# Altium PCB CSI2-KRIA-KV260_Rev01.PcbDoc (part 2 of 3)
Units mm, origin at the board's own origin, x right, y up, seen from the top; angles counter-clockwise.
Board outline 119 x 44.5 mm, 4 copper layers (Layer1 Top, Layer2, Layer3, Layer4 Bottom), stack 1.59 mm thick; 145 components, 82 nets, 488 pads, 229 vias.
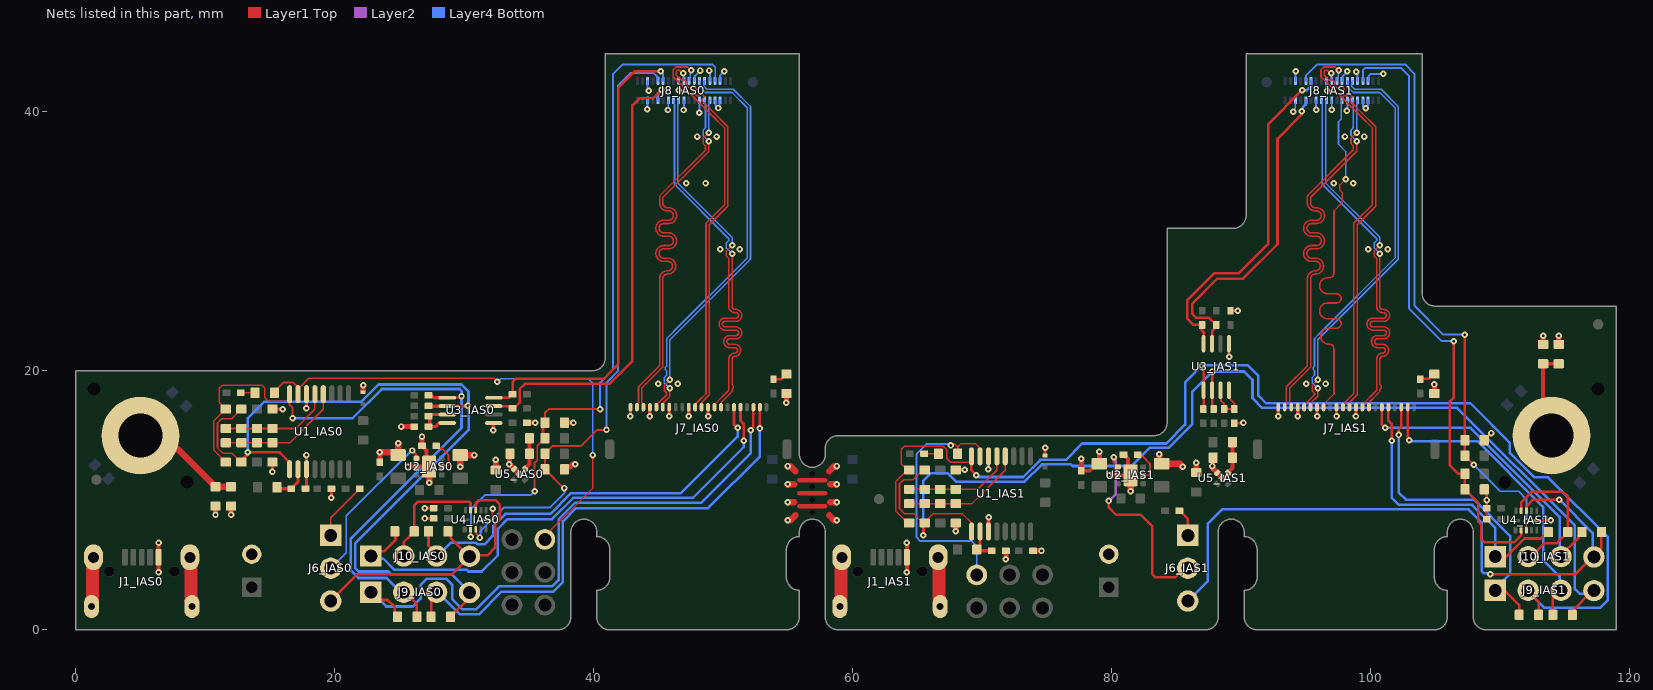
[diagram p4: the nets of this part, all layers, seen from the top]

## Via types
v1: diameter 0.5, hole 0.2, Layer1 Top to Layer4 Bottom, 229 vias

## Nets (pads, with @x,y where several pads share a name; then routed paths per layer and width w, separated by ;. In a path a pad name is that pad's centre, name@x,y a point inside that pad or via, vN(x,y) a via of type N, cw(c..) or ccw(c..) an arc to the next point about the centre after c; other vN are vias at no path point) (continued)
B7-CSI2-TXC_IAS1_P: J7_IAS1.15 J8_IAS1.7 | length 31.1
  Layer1 Top w0.125: J7_IAS1.15@96.39,17.2 96.39,17.411 97.19,18.211 97.19,20.825 97.19,21.706 ccw(c96.827,21.706) 96.827,22.069 96.782,22.069 cw(c96.782,22.681) 96.782,23.294 97.383,23.294 ccw(c97.383,23.656) 97.383,24.019 96.692,24.019 cw(c96.692,24.631) 96.692,25.244 97.383,25.244 ccw(c97.383,25.606) 97.383,25.969 96.692,25.969 cw(c96.692,26.581) 96.692,27.194 96.827,27.194 ccw(c96.827,27.556) 97.19,27.556 97.19,30.669 97.19,32.35 97.84,33 97.84,33.775 97.652,33.963 97.652,34.362 v1(98.09,34.8)
  Layer4 Bottom w0.125: J8_IAS1.7@97.82,40.9 97.767,40.847 97.767,40.612 97.745,40.589 97.745,39.455 97.54,39.25 97.54,37.5 98.09,36.95 v1(98.09,34.8)
B7-CSI2-TXD0_IAS0_N: J7_IAS0.20 J8_IAS0.5 | length 31.1
  Layer1 Top w0.125: J7_IAS0.20@43.85,17.15 J7_IAS0.20@43.85,17.2 43.85,17.411 43.725,17.536 43.725,18.671 45.35,20.296 45.35,26.389 45.35,27.118 cw(c45.712,27.118) 45.712,27.481 45.736,27.481 ccw(c45.736,28.093) 45.736,28.706 45.425,28.706 cw(c45.425,29.068) 45.425,29.431 45.808,29.431 ccw(c45.808,30.043) 45.808,30.656 45.425,30.656 cw(c45.425,31.018) 45.425,31.381 45.808,31.381 ccw(c45.808,31.993) 45.808,32.606 45.712,32.606 cw(c45.712,32.968) 45.35,32.968 45.35,33.156 45.35,33.396 48.9,36.946 v1(48.9,37.75)
  Layer4 Bottom w0.125: J8_IAS0.5@48.58,40.9 48.632,40.848 48.632,40.607 48.65,40.589 48.65,38.775 48.462,38.587 48.462,38.188 v1(48.9,37.75)
B7-CSI2-TXD0_IAS0_P: J7_IAS0.21 J8_IAS0.4 | length 31.1
  Layer1 Top w0.125: J7_IAS0.21@43.35,17.2 43.35,17.411 43.475,17.536 43.475,18.775 45.1,20.4 45.1,26.389 45.1,27.118 cw(c45.712,27.118) 45.712,27.731 45.736,27.731 ccw(c45.736,28.093) 45.736,28.456 45.425,28.456 cw(c45.425,29.068) 45.425,29.681 45.808,29.681 ccw(c45.808,30.043) 45.808,30.406 45.425,30.406 cw(c45.425,31.018) 45.425,31.631 45.808,31.631 ccw(c45.808,31.993) 45.808,32.356 45.712,32.356 cw(c45.712,32.968) 45.1,32.968 45.1,33.156 45.1,33.5 48.65,37.05 48.65,37.375 48.462,37.563 48.462,37.962 v1(48.9,38.4)
  Layer4 Bottom w0.125: v1(48.9,38.4) 48.9,40.589 48.927,40.617 48.927,40.848 J8_IAS0.4@48.98,40.9
B7-CSI2-TXD0_IAS1_N: J7_IAS1.20 J8_IAS1.5 | length 31.1
  Layer1 Top w0.125: J7_IAS1.20@93.89,17.15 J7_IAS1.20@93.89,17.2 93.89,17.411 93.765,17.536 93.765,18.671 95.39,20.296 95.39,26.389 95.39,27.118 cw(c95.753,27.118) 95.753,27.481 95.776,27.481 ccw(c95.776,28.093) 95.776,28.706 95.465,28.706 cw(c95.465,29.068) 95.465,29.431 95.848,29.431 ccw(c95.848,30.043) 95.848,30.656 95.465,30.656 cw(c95.465,31.018) 95.465,31.381 95.848,31.381 ccw(c95.848,31.993) 95.848,32.606 95.753,32.606 cw(c95.753,32.968) 95.39,32.968 95.39,33.156 95.39,33.416 98.94,36.966 v1(98.94,37.75)
  Layer4 Bottom w0.125: J8_IAS1.5@98.62,40.9 98.672,40.847 98.672,40.607 98.69,40.589 98.69,38.775 98.502,38.587 98.502,38.188 v1(98.94,37.75)
B7-CSI2-TXD0_IAS1_P: J7_IAS1.21 J8_IAS1.4 | length 31.1
  Layer1 Top w0.125: J7_IAS1.21@93.39,17.2 93.39,17.411 93.515,17.536 93.515,18.775 95.14,20.4 95.14,26.389 95.14,27.118 cw(c95.753,27.118) 95.753,27.731 95.776,27.731 ccw(c95.776,28.093) 95.776,28.456 95.465,28.456 cw(c95.465,29.068) 95.465,29.681 95.848,29.681 ccw(c95.848,30.043) 95.848,30.406 95.465,30.406 cw(c95.465,31.018) 95.465,31.631 95.848,31.631 ccw(c95.848,31.993) 95.848,32.356 95.753,32.356 cw(c95.753,32.968) 95.14,32.968 95.14,33.156 95.14,33.52 98.69,37.07 98.69,37.375 98.502,37.563 98.502,37.962 v1(98.94,38.4)
  Layer4 Bottom w0.125: v1(98.94,38.4) 98.94,40.589 98.967,40.617 98.967,40.847 J8_IAS1.4@99.02,40.9
B7-CSI2-TXD1_IAS0_N: J7_IAS0.17 J8_IAS0.29 | length 31.1
  Layer1 Top w0.125: J7_IAS0.17@45.35,17.2 45.383,17.233 45.383,17.53 45.9,18.046 v1(45.9,18.65)
  Layer4 Bottom w0.125: v1(45.9,18.65) 45.462,19.088 45.462,19.487 45.65,19.675 45.65,19.805 45.65,19.811 45.65,19.995 45.541,20.105 45.541,20.255 45.65,20.364 45.65,20.464 45.65,22.5 46.176,23.026 ; 46.2,23.05 51.873,28.723 51.873,40.323 50.696,41.5 48.646,41.5 48.573,41.573 48.255,41.891 48.255,42.089 48.232,42.112 48.232,42.348 J8_IAS0.29@48.18,42.4
B7-CSI2-TXD1_IAS0_P: J7_IAS0.18 J8_IAS0.30 | length 31.1
  Layer1 Top w0.125: J7_IAS0.18@44.85,17.2 44.85,17.358 45.65,18.158 45.65,18.275 45.462,18.463 45.462,18.862 v1(45.9,19.3)
  Layer4 Bottom w0.125: v1(45.9,19.3) 45.9,22.396 52.123,28.62 52.123,40.427 50.8,41.75 48.75,41.75 48.505,41.995 48.505,42.089 48.527,42.112 48.527,42.348 J8_IAS0.30@48.58,42.4
B7-CSI2-TXD1_IAS1_N: J7_IAS1.17 J8_IAS1.29 | length 31.1
  Layer1 Top w0.125: J7_IAS1.17@95.39,17.2 95.423,17.233 95.423,17.53 95.94,18.046 v1(95.94,18.65)
  Layer4 Bottom w0.125: v1(95.94,18.65) 95.502,19.088 95.502,19.487 95.69,19.675 95.69,19.805 95.69,19.811 95.69,19.995 95.581,20.105 95.581,20.255 95.69,20.364 95.69,20.464 95.69,22.5 96.216,23.026 ; 96.24,23.05 101.913,28.723 101.913,40.323 100.736,41.5 98.686,41.5 98.613,41.573 98.295,41.891 98.295,42.089 98.272,42.112 98.272,42.347 J8_IAS1.29@98.22,42.4
B7-CSI2-TXD1_IAS1_P: J7_IAS1.18 J8_IAS1.30 | length 31.1
  Layer1 Top w0.125: J7_IAS1.18@94.89,17.2 94.89,17.358 95.69,18.158 95.69,18.275 95.502,18.462 95.502,18.862 v1(95.94,19.3)
  Layer4 Bottom w0.125: v1(95.94,19.3) 95.94,22.396 102.163,28.62 102.163,40.427 100.84,41.75 98.79,41.75 98.545,41.995 98.545,42.089 98.567,42.112 98.567,42.347 J8_IAS1.30@98.62,42.4
B7-CSI2-TXD2_IAS0_N: J7_IAS0.11 J8_IAS0.26 | length 31
  Layer1 Top w0.125: v1(46.942,43) 46.841,43 46.621,43.22 46.473,43.22 46.4,43.147 46.4,42.831 46.546,42.685 46.764,42.468 46.867,42.468 46.907,42.508 46.997,42.508 47.208,42.297 47.208,42.207 47.161,42.16 47.161,42.07 47.371,41.86 47.462,41.86 47.624,42.023 47.714,42.023 47.925,41.812 47.925,41.722 47.762,41.559 47.762,41.469 47.972,41.259 48.063,41.259 48.225,41.422 48.316,41.422 48.526,41.211 48.526,41.121 48.37,40.965 48.37,40.861 49.316,39.916 50.37,38.861 50.37,32.72 48.94,31.29 48.94,18.147 48.373,17.58 48.373,17.223 J7_IAS0.11@48.35,17.2
  Layer4 Bottom w0.125: v1(46.942,43) 46.961,42.981 J8_IAS0.26@46.961,42.419
B7-CSI2-TXD2_IAS0_P: J7_IAS0.12 J8_IAS0.27 | length 31.1
  Layer1 Top w0.125: v1(47.535,43.221) 47.503,43.221 47.254,43.47 46.37,43.47 46.15,43.25 46.15,42.728 49.139,39.739 50.12,38.758 50.12,32.824 48.69,31.394 48.69,18.251 48.123,17.683 48.048,17.609 47.85,17.411 J7_IAS0.12@47.85,17.2
  Layer4 Bottom w0.125: J8_IAS0.27@47.38,42.4 47.38,42.585 47.477,42.682 47.477,43.164 v1(47.535,43.221)
B7-CSI2-TXD2_IAS1_N: J7_IAS1.11 J8_IAS1.26 | length 31
  Layer1 Top w0.125: v1(96.982,43) 96.881,43 96.661,43.22 96.513,43.22 96.44,43.147 96.44,42.831 96.586,42.685 96.804,42.468 96.907,42.468 96.947,42.508 97.037,42.508 97.248,42.297 97.248,42.207 97.201,42.16 97.201,42.07 97.411,41.86 97.502,41.86 97.664,42.023 97.754,42.023 97.965,41.812 97.965,41.722 97.802,41.559 97.802,41.469 98.012,41.259 98.103,41.259 98.265,41.421 98.356,41.421 98.566,41.211 98.566,41.121 98.41,40.965 98.41,40.861 99.356,39.916 100.41,38.861 100.41,32.72 98.98,31.29 98.98,18.147 98.413,17.58 98.413,17.223 J7_IAS1.11@98.39,17.2
  Layer4 Bottom w0.125: v1(96.982,43) 97.001,42.981 J8_IAS1.26@97.001,42.419
B7-CSI2-TXD2_IAS1_P: J7_IAS1.12 J8_IAS1.27 | length 31.1
  Layer1 Top w0.125: v1(97.575,43.221) 97.543,43.221 97.294,43.47 96.41,43.47 96.19,43.25 96.19,42.728 99.179,39.739 100.16,38.758 100.16,32.824 98.73,31.394 98.73,18.251 98.163,17.683 98.088,17.609 97.89,17.411 J7_IAS1.12@97.89,17.2
  Layer4 Bottom w0.125: J8_IAS1.27@97.42,42.4 97.42,42.585 97.517,42.682 97.517,43.164 v1(97.575,43.221)
B7-CSI2-TXD3_IAS0_N: J7_IAS0.8 J8_IAS0.11 | length 31
  Layer1 Top w0.125: J7_IAS0.8@49.876,17.226 49.876,17.576 50.475,18.175 50.7,18.4 50.7,18.59 50.805,18.695 50.805,18.845 50.7,18.95 50.7,19.05 50.7,20 50.7,20.052 50.7,20.912 cw(c50.913,20.912) 50.913,21.125 ccw(c50.913,21.587) 50.913,22.05 50.511,22.05 cw(c50.511,22.262) 50.511,22.475 50.988,22.475 ccw(c50.988,22.937) 50.988,23.4 50.163,23.4 cw(c50.163,23.612) 50.163,23.825 50.988,23.825 ccw(c50.988,24.287) 50.988,24.75 50.913,24.75 cw(c50.913,24.962) 50.7,24.962 50.7,25.15 v1(50.7,29.05)
  Layer4 Bottom w0.125: J8_IAS0.11@46.18,40.9 46.232,40.848 46.232,40.612 46.255,40.589 46.255,34.406 50.45,30.211 50.45,30.075 50.262,29.887 50.262,29.488 v1(50.7,29.05)
B7-CSI2-TXD3_IAS0_P: J7_IAS0.9 J8_IAS0.10 | length 31.1
  Layer1 Top w0.125: J7_IAS0.9@49.35,17.2 49.35,17.404 50.45,18.504 50.45,20.052 50.45,20.912 cw(c50.913,20.912) 50.913,21.375 ccw(c50.913,21.587) 50.913,21.8 50.511,21.8 cw(c50.511,22.262) 50.511,22.725 50.988,22.725 ccw(c50.988,22.937) 50.988,23.15 50.163,23.15 cw(c50.163,23.612) 50.163,24.075 50.988,24.075 ccw(c50.988,24.287) 50.988,24.5 50.913,24.5 cw(c50.913,24.962) 50.45,24.962 50.45,25.15 50.45,28.675 50.262,28.863 50.262,29.262 v1(50.7,29.7)
  Layer4 Bottom w0.125: J8_IAS0.10@46.58,40.9 46.527,40.848 46.527,40.612 46.505,40.589 46.505,34.509 50.7,30.314 v1(50.7,29.7)
B7-CSI2-TXD3_IAS1_N: J7_IAS1.8 J8_IAS1.11 | length 31
  Layer1 Top w0.125: J7_IAS1.8@99.916,17.226 99.916,17.576 100.515,18.175 100.74,18.4 100.74,18.59 100.845,18.695 100.845,18.845 100.74,18.95 100.74,19.05 100.74,20 100.74,20.052 100.74,20.912 cw(c100.952,20.912) 100.952,21.125 ccw(c100.952,21.587) 100.952,22.05 100.551,22.05 cw(c100.551,22.262) 100.551,22.475 101.027,22.475 ccw(c101.027,22.937) 101.027,23.4 100.202,23.4 cw(c100.202,23.612) 100.202,23.825 101.027,23.825 ccw(c101.027,24.287) 101.027,24.75 100.952,24.75 cw(c100.952,24.962) 100.74,24.962 100.74,25.15 v1(100.74,29.05)
  Layer4 Bottom w0.125: J8_IAS1.11@96.22,40.9 96.272,40.847 96.272,40.612 96.295,40.589 96.295,34.406 100.49,30.211 100.49,30.075 100.302,29.887 100.302,29.488 v1(100.74,29.05)
B7-CSI2-TXD3_IAS1_P: J7_IAS1.9 J8_IAS1.10 | length 31.1
  Layer1 Top w0.125: J7_IAS1.9@99.39,17.2 99.39,17.404 100.49,18.504 100.49,20.052 100.49,20.912 cw(c100.952,20.912) 100.952,21.375 ccw(c100.952,21.587) 100.952,21.8 100.551,21.8 cw(c100.551,22.262) 100.551,22.725 101.027,22.725 ccw(c101.027,22.937) 101.027,23.15 100.202,23.15 cw(c100.202,23.612) 100.202,24.075 101.027,24.075 ccw(c101.027,24.287) 101.027,24.5 100.952,24.5 cw(c100.952,24.962) 100.49,24.962 100.49,25.15 100.49,28.675 100.302,28.863 100.302,29.262 v1(100.74,29.7)
  Layer4 Bottom w0.125: J8_IAS1.10@96.62,40.9 96.567,40.847 96.567,40.612 96.545,40.589 96.545,34.509 100.74,30.314 v1(100.74,29.7)
C-GND_IAS0: C10_IAS0.2 J1_IAS0.6 J1_IAS0.7 J1_IAS0.8 J1_IAS0.9 R24_IAS0.1 X1_IAS0.1 | length 16.4
  Layer1 Top w0.5: X1_IAS0.1@5,15 6.052,13.948 7.902,13.948 10.65,11.2 10.65,11.15 10.75,11.05 R24_IAS0.1@12,11.05
  Layer1 Top w1: J1_IAS0.6@1.225,1.8 1.225,2.166 1.3,2.241 1.3,5.525 J1_IAS0.7@1.375,5.6 ; J1_IAS0.8@8.825,5.6 8.9,5.525 8.9,2.241 8.975,2.166 J1_IAS0.9@8.975,1.8
C-GND_IAS1: C10_IAS1.2 J1_IAS1.6 J1_IAS1.7 J1_IAS1.8 J1_IAS1.9 R24_IAS1.1 X1_IAS1.1 | length 13.6
  Layer1 Top w0.3: X1_IAS1.1@114,15 113.35,15.65 C10_IAS1.2@113.35,20.55 R24_IAS1.1@114.55,20.55
  Layer1 Top w1: J1_IAS1.6@59.1,2.241 J1_IAS1.7@59.1,5.525 ; J1_IAS1.9@66.7,2.241 J1_IAS1.8@66.7,5.525
EXT-GPIO0-I2C-SCL_IAS0: J7_IAS0.2 J9_IAS0.3 R15_IAS0.1 | length 39.5
  Layer1 Top w0.2: R15_IAS0.1@27.45,1 27.45,2.164 27.88,2.594 J9_IAS0.3@27.88,2.9 J9_IAS0.3@27.88,3 ; v1(52.85,15.55) J7_IAS0.2@52.85,17.2
  Layer4 Bottom w0.2: J9_IAS0.3@27.88,3 29.68,1.2 31.15,1.2 32.9,2.95 36.9,2.95 37.625,3.675 37.625,8.375 38.65,9.4 48.85,9.4 52.85,13.4 v1(52.85,15.55)
EXT-GPIO0-I2C-SCL_IAS1: J7_IAS1.2 J9_IAS1.3 R15_IAS1.1 | length 24.2
  Layer1 Top w0.2: J7_IAS1.2@102.89,17.2 102.89,14.76 v1(103,14.65) ; R15_IAS1.1@114.1,1.15 114.1,2.52 J9_IAS1.3@114.63,3.05
  Layer4 Bottom w0.2: v1(103,14.65) 103.1,14.55 108.3,14.55 113.35,9.5 113.35,5.4 114.63,4.12 J9_IAS1.3@114.63,3.05
EXT-GPIO1-I2C-SDA_IAS0: J7_IAS0.3 J9_IAS0.1 R16_IAS0.1 | length 47.5
  Layer1 Top w0.2: J9_IAS0.1@22.8,3 23.5,2.3 24.1,2.3 24.648,1.752 24.648,1.202 R16_IAS0.1@24.85,1 ; v1(52.15,15.4) 52.15,15.467 52.35,15.667 J7_IAS0.3@52.35,17.2
  Layer4 Bottom w0.2: J9_IAS0.1@22.8,3 24,1.8 26.05,1.8 26.65,2.4 26.65,3.45 27.15,3.95 28.6,3.95 29.1,3.45 29.1,2.35 29.85,1.6 30.95,1.6 32.7,3.35 36.8,3.35 37.3,3.85 37.3,8.539 38.586,9.825 48.325,9.825 52.15,13.65 v1(52.15,15.4)
EXT-GPIO1-I2C-SDA_IAS1: J7_IAS1.3 J9_IAS1.1 R16_IAS1.1 | length 24.7
  Layer1 Top w0.2: v1(102.2,15.05) 102.19,15.06 102.19,15.467 102.39,15.667 J7_IAS1.3@102.39,17.2 ; J9_IAS1.1@109.55,3.05 110.35,3.05 111.5,1.9 111.5,1.35 111.4,1.25 R16_IAS1.1@111.5,1.15
  Layer4 Bottom w0.2: v1(102.2,15.05) 102.19,15.04 102.19,10.61 102.75,10.05 108,10.05 110.8,7.25 110.8,4.3 J9_IAS1.1@109.55,3.05
EXT-GPIO2_IAS0: J7_IAS0.5 J10_IAS0.1 R18_IAS0.1 | length 40.7
  Layer1 Top w0.2: J10_IAS0.1@22.8,5.7 23.158,6.058 23.808,6.058 24.7,6.95 24.7,7.55 R18_IAS0.1@24.65,7.6 ; J7_IAS0.5@51.35,17.2 51.35,16.15 51.6,15.9 v1(51.6,14.6)
  Layer4 Bottom w0.2: J10_IAS0.1@22.8,5.6 22.912,5.488 23.762,5.488 24.6,4.65 24.905,4.65 28.315,4.65 30.186,4.65 30.336,4.5 31.35,4.5 32.6,5.75 32.6,7.8 33.35,8.55 36.8,8.55 38.45,10.2 47.7,10.2 51.6,14.1 v1(51.6,14.6)
EXT-GPIO2_IAS1: J7_IAS1.5 J10_IAS1.1 R18_IAS1.1 | length 23.2
  Layer1 Top w0.2: J7_IAS1.5@101.39,17.2 101.39,16.15 101.64,15.9 v1(101.64,14.6) ; J10_IAS1.1@109.55,5.65 110.5,5.65 111.9,7.05 113.2,7.05 113.7,7.55 R18_IAS1.1@113.75,7.55
  Layer4 Bottom w0.2: v1(101.64,14.6) 101.64,14.1 101.64,10.21 102.2,9.65 107.85,9.65 109.65,7.85 J10_IAS1.1@109.65,5.75
EXT-GPIO3_IAS0: J7_IAS0.6 J10_IAS0.3 R17_IAS0.1 | length 32.2
  Layer1 Top w0.2: R17_IAS0.1@27.25,7.6 27.25,6.495 27.88,5.865 J10_IAS0.3@27.88,5.7 ; J7_IAS0.6@50.85,17.2 50.85,15.85 51.1,15.6 v1(51.125,15.6)
  Layer4 Bottom w0.2: J10_IAS0.3@27.88,5.6 29.005,6.725 30.928,6.725 31.053,6.6 31.583,6.6 32.25,7.267 32.25,8 33.2,8.95 36.661,8.95 38.261,10.55 46.75,10.55 51.125,14.925 v1(51.125,15.6)
EXT-GPIO3_IAS1: J7_IAS1.6 J10_IAS1.3 R17_IAS1.1 | length 23.9
  Layer1 Top w0.2: J7_IAS1.6@100.89,17.2 100.89,15.85 101.14,15.6 v1(101.165,15.6) ; J10_IAS1.3@114.63,5.65 116.076,7.096 116.076,7.276 R17_IAS1.1@116.35,7.55 R17_IAS1.1@116.35,7.37
  Layer4 Bottom w0.2: v1(101.165,15.6) 107.75,15.6 114.63,8.72 J10_IAS1.3@114.63,5.65
GND: C1_IAS0.2 C1_IAS1.2 C2_IAS0.2 C2_IAS1.2 C3_IAS0.2 C3_IAS1.2 C4_IAS0.2 C4_IAS1.2 C5_IAS0.2 C5_IAS1.2 C6_IAS0.2 C6_IAS1.2 C7_IAS0.2 C7_IAS1.2 C8_IAS0.2 C8_IAS1.2 C9_IAS0.2 C9_IAS1.2 C10_IAS0.1 C10_IAS1.1 C11_IAS0.2 C11_IAS1.2 C12_IAS0.2 C12_IAS1.2 D1_IAS0.A D1_IAS1.A D3_IAS0.K D3_IAS1.K J1_IAS0.5 J1_IAS1.5 J2_IAS0.2 J2_IAS1.2 J7_IAS0.10 J7_IAS0.13 J7_IAS0.16 J7_IAS0.19 J7_IAS0.22 J7_IAS1.10 J7_IAS1.13 J7_IAS1.16 J7_IAS1.19 J7_IAS1.22 J8_IAS0.2 J8_IAS0.3 J8_IAS0.6 J8_IAS0.9 J8_IAS0.12 J8_IAS0.16 J8_IAS0.19 J8_IAS0.25 J8_IAS0.28 J8_IAS0.31 J8_IAS0.33 J8_IAS1.2 J8_IAS1.3 J8_IAS1.6 J8_IAS1.9 J8_IAS1.12 J8_IAS1.16 J8_IAS1.19 J8_IAS1.25 J8_IAS1.28 J8_IAS1.31 J8_IAS1.33 R9_IAS0.1 R9_IAS1.1 R10_IAS0.1 R10_IAS1.1 R14_IAS0.1 R14_IAS1.1 R24_IAS0.2 R24_IAS1.2 R74_IAS0.1 R74_IAS1.1 R75_IAS0.1 R75_IAS1.1 U1_IAS0.6 U1_IAS0.11 U1_IAS1.6 U1_IAS1.11 U2_IAS0.5 U2_IAS0.7 U2_IAS1.5 U2_IAS1.7 U3_IAS0.1 U3_IAS1.1 U4_IAS0.6 U4_IAS1.6 U5_IAS0.2 U5_IAS0.5 U5_IAS1.2 U5_IAS1.5 | length 91.7
  Layer1 Top w0.15: U4_IAS0.6@31.725,8.5 31.76,8.535 32.062,8.535 32.2,8.673 v1(32.2,9.35) ; v1(46.596,41.663) v1@46.659,41.6 ; v1(48.25,43.2) v1@48.3,43.2 ; v1@95.835,40.165 v1(95.835,40.18) ; v1(98.194,40.105) v1@98.24,40.15 ; v1@100.91,42.94 v1(100.991,42.94)
  Layer1 Top w0.2: U3_IAS1.1@89.075,22.1 89.075,21.125 v1(89.1,21.1) ; C6_IAS1.2@89.2,24.65 v1(89.75,24.65) ; C7_IAS1.2@89.5,15.95 90.15,15.95 v1(90.2,16) ; v1(96.654,41.644) v1@96.7,41.599 ; R74_IAS1.1@108.8,10.85 109,10.65 v1(109,10.025) C9_IAS1.2@109,9.4 C8_IAS1.2@109,8.55 ; R75_IAS1.1@108.8,14.65 108.8,14.7 109.05,14.95 109.1,14.95 109.3,15.15 v1(109.349,15.199) ; U4_IAS1.6@112.825,8.45 v1(113.95,8.45)
  Layer1 Top w0.25: v1(15.2,12.21) R10_IAS0.1@15.2,12.85 ; R9_IAS0.1@15.35,17.05 v1(15.99,17.05) ; C2_IAS0.2@17.825,10.9 v1(17.825,13.5) ; v1(17.825,17.1) U1_IAS0.6@17.825,18.2 ; v1(19.75,10.2) C1_IAS0.2@19.75,10.9 ; v1(26.95,8.6) C8_IAS0.2@27.65,8.6 ; v1(26.95,9.4) C9_IAS0.2@27.65,9.4 ; v1(42.85,16.501) J7_IAS0.22@42.85,17.2 ; v1(44.35,16.501) J7_IAS0.19@44.35,17.2 ; v1(45.85,16.501) J7_IAS0.16@45.85,17.2 ; v1(47.35,16.501) J7_IAS0.13@47.35,17.2 ; v1(48.85,16.501) J7_IAS0.10@48.85,17.2 ; R9_IAS1.1@68.028,12.35 v1(68.668,12.35) ; v1(70.503,12.4) U1_IAS1.6@70.503,13.5 ; D1_IAS1.A@74.878,13.55 v1(74.878,14.05) ; v1(92.89,16.501) J7_IAS1.22@92.89,17.2 ; v1(94.39,16.501) J7_IAS1.19@94.39,17.2 ; v1(95.89,16.501) J7_IAS1.16@95.89,17.2 ; v1(97.39,16.501) J7_IAS1.13@97.39,17.2 ; v1(98.89,16.501) J7_IAS1.10@98.89,17.2
  Layer1 Top w0.3: v1(6.4,4.46) J1_IAS0.5@6.4,5.1 ; J1_IAS0.5@6.4,6.1 v1(6.4,6.74) ; v1(25.65,12.6) U2_IAS0.7@27.3,12.6 ; R14_IAS0.1@26.9,14.05 27.1,13.85 U2_IAS0.7@27.1,13.4 ; v1(32.25,15.4) 32.25,15.925 U3_IAS0.1@32.3,15.975 ; v1(64.2,4.46) J1_IAS1.5@64.2,5.1 ; J1_IAS1.5@64.2,6.1 v1(64.2,6.74) ; U1_IAS1.11@70.503,7.6 70.503,8.678 v1(70.525,8.7) ; C5_IAS1.2@77.678,12.287 78.328,12.287 78.578,12.537 78.778,12.537 C3_IAS1.2@79.078,12.837 ; v1(79.828,11.937) U2_IAS1.7@81.478,11.937 ; R14_IAS1.1@80.928,13.537 80.978,13.537 81.078,13.437 81.078,13.387 81.278,13.187 U2_IAS1.7@81.278,12.737
  Layer1 Top w0.35: 55.9,9.55 57.884,9.55 ; 55.904,10.55 57.888,10.55 ; 55.904,11.55 57.888,11.55
  Layer1 Top w0.4: v1(10.8,8.9) C10_IAS0.1@10.8,9.55 ; v1(12,8.9) R24_IAS0.2@12,9.55 ; D1_IAS0.A@22.2,18.4 v1(22.2,18.9) ; C5_IAS0.2@23.5,12.95 v1(23.5,13.7) ; v1(25.15,15.7) C7_IAS0.2@26.15,15.7 ; R14_IAS0.1@26.75,14.2 v1(26.75,14.9) ; C11_IAS0.2@32.45,12.35 v1(32.45,13.15) ; C12_IAS0.2@33.5,13.55 v1(33.5,12.8) U5_IAS0.2@33.875,12.425 U5_IAS0.5@34.3,12 ; C6_IAS0.2@34.85,16 v1(35.5,16) ; R75_IAS0.1@37.75,12.4 37.75,12.589 38.212,12.589 38.423,12.8 v1(38.6,12.8) ; R74_IAS0.1@37.75,16 v1(38.45,16) ; v1(54.9,17.55) D3_IAS0.K@54.9,18.2 ; v1(67.978,7.6) R10_IAS1.1@67.978,8.25 ; v1(71.85,5.45) C2_IAS1.2@71.85,6.1 ; C1_IAS1.2@73.95,6.1 v1(74.6,6.1) ; C5_IAS1.2@77.68,12.473 v1(77.68,13.223) ; C3_IAS1.2@79.078,13.1 v1(79.078,13.75) ; C11_IAS1.2@86.55,12.15 v1(86.55,12.9) ; C12_IAS1.2@87.85,13.3 87.819,13.269 87.819,12.669 v1(87.8,12.65) 87.8,12.5 U5_IAS1.2@88.175,12.125 U5_IAS1.5@88.6,11.7 ; D3_IAS1.K@104.95,18.1 v1(104.95,18.95) ; C10_IAS1.1@113.35,22.05 v1(113.35,22.7) ; R24_IAS1.2@114.55,22.05 v1(114.55,22.7)
  Layer1 Top w0.5: v1(23.5,13.7) 24.7,13.7 C3_IAS0.2@24.9,13.5 v1(24.9,14.4) ; v1(27.3,11.35) U2_IAS0.7@27.3,12.6 ; v1(29.7,12.6) C4_IAS0.2@29.7,13.5 ; C4_IAS0.2@29.9,13.5 v1(30.8,13.5) ; v1@55.003,8.45 55.2,8.45 55.6,8.85 ; v1@55.003,9.85 55.5,9.85 ; v1@55.003,11.25 55.5,11.25 ; v1@55.003,12.65 55.2,12.65 55.6,12.25 ; 58.2,8.85 58.6,8.45 v1@58.796,8.45 ; 58.2,12.25 58.6,12.65 v1@58.796,12.65 ; 58.3,9.85 v1@58.796,9.85 ; 58.3,11.25 v1@58.796,11.25 ; v1(81.478,10.687) U2_IAS1.7@81.478,11.937 ; v1(83.7,13.55) 83.7,13.016 C4_IAS1.2@83.878,12.837 85.263,12.837 v1(85.5,12.6)
  Layer4 Bottom w0.15: v1(44.15,40.2) 44.17,40.22 J8_IAS0.16@44.17,40.9 ; J8_IAS0.19@44.18,42.4 44.18,41.72 v1(44.25,41.65) ; v1(45.75,40.15) 45.77,40.17 J8_IAS0.12@45.77,40.9 ; J8_IAS0.25@46.58,42.4 46.62,42.36 46.62,41.687 v1(46.596,41.663) ; v1@46.97,40.17 J8_IAS0.9@46.97,40.9 ; J8_IAS0.28@47.78,42.4 47.815,42.435 47.815,42.765 v1(48.25,43.2) ; v1@48.17,39.97 J8_IAS0.6@48.17,40.7 ; v1(48.95,43.2) 48.98,43.17 J8_IAS0.31@48.98,42.4 ; J8_IAS0.3@49.38,40.9 49.42,40.86 49.42,40.528 49.643,40.305 v1(49.648,40.305) 49.72,40.377 49.72,40.461 49.74,40.481 49.74,40.87 J8_IAS0.2@49.77,40.9 ; J8_IAS0.33@49.78,42.4 49.78,42.83 v1(50.1,43.15) ; v1(94.05,40.01) 94.05,40.105 94.2,40.255 J8_IAS1.16@94.2,40.7 ; J8_IAS1.19@94.22,42.4 94.22,43.13 v1(94.24,43.15) ; J8_IAS1.12@95.82,40.9 95.82,40.195 v1(95.835,40.18) ; J8_IAS1.9@97.02,40.9 97.02,40.17 v1(97.03,40.16) ; J8_IAS1.28@97.82,42.4 97.86,42.44 97.86,42.77 98.22,43.13 v1(98.23,43.13) ; v1(98.194,40.105) 98.22,40.13 J8_IAS1.6@98.22,40.9 ; v1(98.9,43.12) 99,43.02 99,42.42 J8_IAS1.31@99.02,42.4 ; J8_IAS1.3@99.42,40.92 99.433,40.907 99.433,40.477 v1(99.64,40.27) 99.733,40.363 99.733,40.406 99.808,40.481 99.808,40.918 J8_IAS1.2@99.81,40.92 ; J8_IAS1.33@99.82,42.4 99.855,42.435 99.855,42.765 100.03,42.94 v1(100.991,42.94)
  Layer4 Bottom w0.2: J8_IAS1.25@96.62,42.4 96.62,41.77 96.654,41.736 v1(96.654,41.644) ; v1(109.349,15.199) v1(109.349,15.199) v1@109.35,15.3
  other v1: 55,8.45 58.8,8.45 26.95,8.6 26.95,9.4 55,9.85 58.8,9.85 19.75,10.2 55,11.25 58.8,11.25 15.2,12.21 68.668,12.35 55,12.65 58.8,12.65 15.99,17.05 45,19 46.5,19 95.04,19 96.54,19 49.8,29.4 51.3,29.4 99.84,29.4 101.34,29.4 47.15,34.5 48.65,34.5 97.19,34.5 98.69,34.5 48,38.1 49.5,38.1 98.04,38.1 99.54,38.1 48.15,39.95 46.95,40.15
GPIO2_3V3_IAS0: J10_IAS0.2 R18_IAS0.2 U4_IAS0.10 | length 9.4
  Layer1 Top w0.2: J10_IAS0.2@25.34,5.6 25.34,6.79 25.812,7.262 25.852,7.262 26.15,7.561 26.15,9.6 26.45,9.9 30.397,9.9 30.498,9.798 30.498,9.252 U4_IAS0.10@30.5,9.25
GPIO2_3V3_IAS1: J10_IAS1.2 R18_IAS1.2 U4_IAS1.10 | length 11.5
  Layer1 Top w0.2: U4_IAS1.10@111.65,9.2 111.65,9.85 112.45,10.65 114.9,10.65 115.25,10.3 R18_IAS1.2@115.25,7.55 115.25,7.5 114.975,7.225 114.925,7.225 114.375,6.675 113.425,6.675 112.4,5.65 J10_IAS1.2@112.09,5.65
GPIO2_IAS0: J8_IAS0.32 R72_IAS0.1 R74_IAS0.2 U4_IAS0.2 | length 54.7
  Layer1 Top w0.15: v1(30.5,7.2) U4_IAS0.2@30.5,7.75 ; v1(35.45,10.7) 35.45,12.908 35.65,13.108 35.65,14.2 R72_IAS0.1@36.25,14.8 ; R74_IAS0.2@36.25,16 36.25,16.75 36.55,17.05 v1(40.5,17.05)
  Layer1 Top w0.25: R72_IAS0.1@36.25,14.8 36.1,14.95 36.1,15.85 R74_IAS0.2@36.25,16
  Layer4 Bottom w0.15: v1(30.5,7.2) 30.55,7.25 30.55,9.35 31.6,10.4 35.15,10.4 v1(35.45,10.7) ; v1(40.5,17.05) 40.5,19.1 41.5,20.1 41.5,42.9 42.271,43.671 49.179,43.671 49.4,43.45 49.4,43.014 49.4,42.42 J8_IAS0.32@49.38,42.4
GPIO2_IAS1: J8_IAS1.32 R72_IAS1.1 R74_IAS1.2 U4_IAS1.2 | length 47.7
  Layer1 Top w0.2: v1(106.45,22.3) 106.45,17.95 106.15,17.65 106.15,12.7 106.8,12.05 R72_IAS1.1@107.3,12.05 R74_IAS1.2@107.3,10.85 108.349,9.801 108.349,8.362 108.562,8.149 108.562,7.01 108.8,6.772 111.122,6.772 111.65,7.3 U4_IAS1.2@111.65,7.7
  Layer4 Bottom w0.15: J8_IAS1.32@99.42,42.4 99.42,43.21 99.606,43.396 102.354,43.396 103,42.75 103,24.8 105.5,22.3 v1(106.45,22.3)
GPIO3_3V3_IAS0: J6_IAS0.3 J10_IAS0.4 R17_IAS0.2 U4_IAS0.9 | length 23.2
  Layer1 Top w0.2: J6_IAS0.3@19.7,2.22 21.78,4.3 29.095,4.3 J10_IAS0.4@30.42,5.625 ; R17_IAS0.2@28.75,7.6 28.961,7.389 28.961,7.084 J10_IAS0.4@30.42,5.625 ; U4_IAS0.9@30.9,9.25 30.9,9.8 31.1,10 32.45,10 32.75,9.7 32.75,8.5 32.4,8.15 32.4,6.35 31.8,5.75 30.545,5.75 J10_IAS0.4@30.42,5.625
GPIO3_3V3_IAS1: J6_IAS1.3 J10_IAS1.4 R17_IAS1.2 U4_IAS1.9 | length 52.4
  Layer1 Top w0.2: v1(109.25,4.3) 115.845,4.3 J10_IAS1.4@117.17,5.625 ; U4_IAS1.9@112.05,9.2 112.06,9.21 112.06,9.53 112.58,10.05 v1(114.6,10.05) ; J10_IAS1.4@117.17,5.626 117.85,6.306 R17_IAS1.2@117.85,7.55
  Layer4 Bottom w0.2: J6_IAS1.3@85.9,2.22 87.45,3.77 87.45,8.2 88.55,9.3 107.6,9.3 108.6,8.3 108.6,4.55 108.793,4.357 109.193,4.357 v1(109.25,4.3) ; v1(114.6,10.05) 117.17,7.48 J10_IAS1.4@117.17,5.625
I2C_SCL_3V3_IAS0: J9_IAS0.4 R7_IAS0.1 R8_IAS0.1 R15_IAS0.2 R22_IAS0.1 U1_IAS0.9 U3_IAS0.6 | length 64.8
  Layer1 Top w0.125: R8_IAS0.1@12.75,12.95 12.05,13.65 11.35,13.65 10.95,14.05 10.95,15.973 11.277,16.3 12.05,16.3 12.467,16.717 12.467,16.763 12.754,17.05 R7_IAS0.1@12.8,17.05 ; U1_IAS0.9@16.525,12.4 U1_IAS0.9@16.525,12.925
  Layer1 Top w0.15: J9_IAS0.4@30.42,2.975 J9_IAS0.4@30.42,3.28
  Layer1 Top w0.2: v1(13.3,13.7) 15.75,13.7 15.8,13.65 U1_IAS0.9@16.525,12.925 ; R15_IAS0.2@28.95,1 28.95,1.05 29.225,1.325 29.275,1.325 30.133,2.183 J9_IAS0.4@30.133,2.688
  Layer1 Top w0.25: R8_IAS0.1@12.8,12.95 12.8,13.05 13.3,13.55 v1(13.3,13.7) ; R22_IAS0.1@27.475,17.275 30.275,17.275 v1(30.3,17.3)
  Layer4 Bottom w0.2: v1(13.3,13.7) 13.3,16.35 14.55,17.6 22.05,17.6 23.4,18.95 29.8,18.95 30.341,18.409 v1@30.341,17.26 ; v1(30.3,17.3) 30.345,17.255 30.345,15.445 21.6,6.7 21.6,4.75 21.85,4.5 24.15,4.5 24.35,4.3 29.045,4.3 J9_IAS0.4@30.42,2.925
I2C_SCL_3V3_IAS1: J9_IAS1.4 R7_IAS1.1 R8_IAS1.1 R15_IAS1.2 R22_IAS1.1 U1_IAS1.9 U3_IAS1.6 | length 90.1
  Layer1 Top w0.125: 64.028,8.95 63.628,9.35 63.628,11.273 63.955,11.6 64.682,11.6 65.145,12.063 65.432,12.35 R7_IAS1.1@65.478,12.35 ; 64.05,8.95 64.75,8.95 R8_IAS1.1@65.45,8.25 ; R8_IAS1.1@65.546,8.25 65.562,8.266 65.833,8.537 65.833,8.583 66.2,8.95 68.5,8.95 69.225,8.225 U1_IAS1.9@69.225,7.7
  Layer1 Top w0.2: v1(87.8,19.95) 87.775,19.925 U3_IAS1.6@87.775,18.5 87.775,17.175 R22_IAS1.1@87.9,17.05 ; R15_IAS1.2@115.6,1.15 115.6,1.455 J9_IAS1.4@117.17,3.025
  Layer1 Top w0.25: R8_IAS1.1@65.45,8.154 R8_IAS1.1@65.5,8.104 ; v1(65.478,7.3) R8_IAS1.1@65.478,8.104
  Layer4 Bottom w0.2: v1(65.478,7.3) 65.478,11.528 66.05,12.1 67.35,12.1 68,11.45 73.3,11.45 74.626,12.776 76.866,12.776 76.992,12.65 81.55,12.65 82.95,14.05 84.4,14.05 86.25,15.9 86.25,18.4 v1(87.8,19.95) 90.25,19.95 90.9,19.3 90.9,17.9 91.65,17.15 106.7,17.15 115.8,8.05 115.8,3.15 116.162,2.788 116.933,2.788 J9_IAS1.4@117.17,3.025
I2C_SCL_IAS0: J8_IAS0.14 R21_IAS0.2 U3_IAS0.3 | length 36.3
  Layer1 Top w0.2: U3_IAS0.3@32.3,17.275 33.575,17.275 R21_IAS0.2@33.75,17.1 33.8,17.05 34.3,17.55 34.3,18.6 34.7,19 41.25,19 43,20.75 43,40.5 43.55,41.05 44.6,41.05 v1(45.25,41.7)
  Layer4 Bottom w0.2: J8_IAS0.14@44.98,40.9 44.98,41.43 v1(45.25,41.7)
I2C_SCL_IAS1: J8_IAS1.14 R21_IAS1.2 U3_IAS1.3 | length 25.1
  Layer1 Top w0.2: U3_IAS1.3@87.775,22.1 87.775,23.075 88.1,23.4 R21_IAS1.2@88.1,23.55 87.55,24.1 86.55,24.1 86.4,24.25 86.25,24.4 86.25,25.2 88.175,27.125 90.175,27.125 92.83,29.78 92.83,37.928 94.653,39.751 94.653,39.983 v1(94.71,40.04)
  Layer4 Bottom w0.2: v1(94.71,40.04) 94.767,40.097 94.767,40.327 95.005,40.565 95.005,40.885 J8_IAS1.14@95.02,40.9
I2C_SDA_3V3_IAS0: J9_IAS0.2 R4_IAS0.1 R5_IAS0.1 R16_IAS0.2 R23_IAS0.1 U1_IAS0.8 U3_IAS0.5 | length 56.5
  Layer1 Top w0.125: R5_IAS0.1@11.6,12.95 11.554,12.95 11.267,13.237 11.267,13.283 10.65,13.9 10.65,16.1 11.267,16.717 11.267,16.763 R4_IAS0.1@11.554,17.05 ; R4_IAS0.1@11.6,17.05 R4_IAS0.1@11.554,17.05 ; U1_IAS0.8@16.5,17.65 14.9,17.65 14.6,17.95 14.6,18.684 14.397,18.888 11.337,18.888 11.1,18.65 11.1,17.55 11.267,17.383 11.267,17.337 R4_IAS0.1@11.554,17.05
  Layer1 Top w0.15: R5_IAS0.1@11.4,12.75 R5_IAS0.1@11.6,12.95 ; U1_IAS0.8@16.525,18.2 16.525,17.375 16.75,17.15 v1(16.75,16.35) ; U3_IAS0.5@28.819,17.925 28.9,17.925 28.918,17.943 29.598,17.943 29.705,18.05 v1(29.8,18.05)
  Layer1 Top w0.2: J9_IAS0.2@25.34,3 26.35,1.99 R16_IAS0.2@26.35,1
  Layer1 Top w0.25: R23_IAS0.1@27.45,18.1 27.5,18.1 27.675,17.925 U3_IAS0.5@28.819,17.925
  Layer4 Bottom w0.2: v1(16.75,16.35) 21.4,16.35 23.65,18.6 29.65,18.6 29.811,18.439 29.811,18.061 v1(29.8,18.05) 29.8,15.6 21.25,7.05 21.25,4.588 21.838,4 24.018,4 24.934,3.084 24.934,3 J9_IAS0.2@25.34,3
I2C_SDA_3V3_IAS1: J9_IAS1.2 R4_IAS1.1 R5_IAS1.1 R16_IAS1.2 R23_IAS1.1 U1_IAS1.8 U3_IAS1.5 | length 93.4
  Layer1 Top w0.125: 63.945,8.583 63.328,9.2 63.328,11.446 63.945,12.063 R4_IAS1.1@64.232,12.35 ; 63.967,8.583 63.967,8.537 64.254,8.25 R5_IAS1.1@64.3,8.25 ; R4_IAS1.1@64.278,12.35 R4_IAS1.1@64.232,12.35 ; U1_IAS1.8@69.178,12.95 67.578,12.95 67.278,13.25 67.278,13.922 67.166,14.034 67.166,14.037 67.015,14.187 67.013,14.187 64.016,14.188 63.778,13.95 63.778,12.804 63.945,12.637 R4_IAS1.1@64.232,12.35
  Layer1 Top w0.15: R5_IAS1.1@64.1,8.05 R5_IAS1.1@64.3,8.25
  Layer1 Top w0.2: U1_IAS1.8@69.178,12.95 69.178,12.322 v1(69.55,11.95) ; v1(87,20.4) 87.125,20.275 U3_IAS1.5@87.125,18.5 87.125,17.075 R23_IAS1.1@87.1,17.05 ; J9_IAS1.2@112.09,3.05 113,2.14 R16_IAS1.2@113,1.15
  Layer4 Bottom w0.2: v1(69.55,11.95) 69.631,11.95 69.781,11.8 73.19,11.8 74.515,13.125 76.475,13.125 77.738,14.388 84.238,14.388 85.7,15.85 85.7,19.1 v1(87,20.4) 87.05,20.45 90.5,20.45 91.35,19.6 91.35,18.1 91.95,17.5 107.719,17.5 110.775,14.444 110.775,13.664 112.664,11.775 113.725,11.775 118.35,7.15 118.35,2.3 117.75,1.7 113.44,1.7 J9_IAS1.2@112.09,3.05
I2C_SDA_IAS0: J8_IAS0.22 R20_IAS0.2 U3_IAS0.4 | length 37.3
  Layer1 Top w0.2: U3_IAS0.4@32.3,17.925 33.475,17.925 R20_IAS0.2@33.75,18.2 33.75,19.15 33.988,19.388 40.788,19.388 41.9,20.499 41.9,41.85 43.2,43.15 v1(45.2,43.15)
  Layer4 Bottom w0.15: v1(45.2,43.15) 45.2,43.075 45.38,42.895 J8_IAS0.22@45.38,42.4 J8_IAS0.22@45.4,42.42
I2C_SDA_IAS1: J8_IAS1.22 R20_IAS1.2 U3_IAS1.4 | length 26.5
  Layer1 Top w0.2: U3_IAS1.4@87.125,22.1 87.125,22.975 87,23.1 R20_IAS1.2@87,23.55 86.35,23.55 85.85,24.05 85.85,25.45 87.95,27.55 89.85,27.55 92.1,29.8 92.1,39.04 v1(94.74,41.68)
  Layer4 Bottom w0.2: v1(94.74,41.68) 95.1,41.68 95.417,41.997 95.417,42.397 J8_IAS1.22@95.42,42.4
INA260-A0_IAS0: R2_IAS0.2 R4_IAS0.2 R7_IAS0.2 R9_IAS0.2 U1_IAS0.5 | length 8.7
  Layer1 Top w0.125: R4_IAS0.2@11.6,15.55 R7_IAS0.2@12.8,15.55 R2_IAS0.2@14,15.55 17,15.55 18.475,17.025 U1_IAS0.5@18.475,18.2
INA260-A0_IAS1: R2_IAS1.2 R4_IAS1.2 R7_IAS1.2 R9_IAS1.2 U1_IAS1.5 | length 8.7
  Layer1 Top w0.125: R4_IAS1.2@64.278,10.85 65.478,10.85 66.678,10.85 69.678,10.85 71.153,12.325 U1_IAS1.5@71.153,13.5
INA260-A1_IAS0: R3_IAS0.2 R5_IAS0.2 R8_IAS0.2 R10_IAS0.2 U1_IAS0.4 | length 9.8
  Layer1 Top w0.125: R5_IAS0.2@11.6,14.45 R8_IAS0.2@12.8,14.45 R3_IAS0.2@14,14.45 16.55,14.45 19.125,17.025 U1_IAS0.4@19.125,18.2
INA260-A1_IAS1: R3_IAS1.2 R5_IAS1.2 R8_IAS1.2 R10_IAS1.2 U1_IAS1.4 | length 9.8
  Layer1 Top w0.125: R5_IAS1.2@64.278,9.75 65.478,9.75 66.678,9.75 69.228,9.75 71.803,12.325 U1_IAS1.4@71.803,13.5
NetC2_IAS0_1: C2_IAS0.1 R6_IAS0.2 U1_IAS0.10 | length 2.9
  Layer1 Top w0.25: R6_IAS0.2@15.45,10.9 C2_IAS0.1@16.65,10.9 16.7,10.9 16.825,11.025 16.825,11.075 17.175,11.425 U1_IAS0.10@17.175,12.4
NetC2_IAS1_1: C2_IAS1.1 R6_IAS1.2 U1_IAS1.10 | length 2.6
  Layer1 Top w0.2: R6_IAS1.2@69.6,6.2 R6_IAS1.2@69.7,6.1
  Layer1 Top w0.25: R6_IAS1.2@69.6,6.2 69.853,6.453 U1_IAS1.10@69.853,7.6 ; R6_IAS1.2@69.85,6.1 C2_IAS1.1@70.75,6.1 ; C2_IAS1.1@70.9,6.2 C2_IAS1.1@70.925,6.225
NetC7_IAS0_1: C7_IAS0.1 R19_IAS0.1 U3_IAS0.7 U3_IAS0.8 | length 4.9
  Layer1 Top w0.25: U3_IAS0.8@29.2,15.975 29.19,15.965 28.13,15.965 28.117,15.952 28.052,15.952 27.8,15.7 C7_IAS0.1@27.25,15.7 27.343,15.793 27.343,16.593 27.375,16.625 U3_IAS0.7@29.2,16.625
NetC7_IAS1_1: C7_IAS1.1 R19_IAS1.1 U3_IAS1.7 U3_IAS1.8 | length 4
  Layer1 Top w0.15: U3_IAS1.7@88.425,18.5 88.45,18.475 88.45,17.7 88.7,17.45 R19_IAS1.1@88.7,17.05 C7_IAS1.1@89.5,17.05 89.5,17.5 89.075,17.925 U3_IAS1.8@89.075,18.5
NetC12_IAS0_1: C12_IAS0.1 R27_IAS0.1 U5_IAS0.1 | length 2.5
  Layer1 Top w0.3: U5_IAS0.1@34.718,12.468 35.05,12.8 R27_IAS0.1@35.05,14.8
NetC12_IAS1_1: C12_IAS1.1 R27_IAS1.1 U5_IAS1.1 | length 2.5
  Layer1 Top w0.3: U5_IAS1.1@89.025,12.125 89.025,12.175 89.35,12.5 C12_IAS1.1@89.35,13.3 R27_IAS1.1@89.35,14.5
NetD2_IAS0_A: D2_IAS0.A R11_IAS0.2 | length 1.1
  Layer1 Top w0.125: R11_IAS0.2@12.75,18.3 D2_IAS0.A@13.85,18.3
NetD2_IAS0_K: D2_IAS0.K TP1_IAS0.1 U1_IAS0.7 | length 40
  Layer1 Top w0.125: U1_IAS0.7@17.175,18.2 17.175,18.626 17.225,18.675 17.347,18.798 17.375,18.798 18.002,19.425 32.31,19.425 32.55,19.186 v1(32.55,19.15) ; TP1_IAS0.1@36.24,6.98 36.24,7.24 39.95,10.95 v1(39.95,13.5)
  Layer1 Top w0.15: D2_IAS0.K@15.35,18.3 15.35,18.35 15.633,18.633 15.633,18.683 16.05,19.1 16.8,19.1 17.175,18.725 U1_IAS0.7@17.175,18.626
  Layer4 Bottom w0.125: v1(32.55,19.15) 32.589,19.15 32.839,19.4 39.6,19.4 39.95,19.05 v1(39.95,13.5)
NetD2_IAS1_A: D2_IAS1.A R11_IAS1.2 | length 1.1
  Layer1 Top w0.125: R11_IAS1.2@65.428,13.6 D2_IAS1.A@66.528,13.6
NetD2_IAS1_K: D2_IAS1.K TP1_IAS1.1 U1_IAS1.7 | length 20.4
  Layer1 Top w0.125: v1(67.581,14.238) 67.581,14.277 67.654,14.35 67.912,14.35 68.128,14.134 ; D2_IAS1.K@68.128,13.6 68.128,14.134 ; U1_IAS1.7@69.853,13.4 69.801,13.453 69.801,14.078 69.495,14.383 68.378,14.383 68.128,14.134
  Layer4 Bottom w0.125: v1@67.569,14.25 v1(67.581,14.238)
  Layer4 Bottom w0.15: v1@67.55,14.348 65.698,14.348 64.95,13.6 64.95,7.15 65.25,6.85 69.2,6.85 69.6,6.45 TP1_IAS1.1@69.6,4.24
NetD3_IAS0_A: D3_IAS0.A R13_IAS0.2 | length 1.2
  Layer1 Top w0.2: R13_IAS0.2@53.9,19.35 54.483,19.35 54.6,19.467 54.6,19.5 54.85,19.75 D3_IAS0.A@54.9,19.75
NetD3_IAS1_A: D3_IAS1.A R13_IAS1.2 | length 0.8
  Layer1 Top w0.2: R13_IAS1.2@103.95,19.4 104.533,19.4 104.65,19.517 D3_IAS1.A@104.65,19.55
NetJ6_IAS0_1: J6_IAS0.1 R12_IAS0.2 | length 4.6
  Layer1 Top w0.15: J6_IAS0.1@19.7,7.3 19.7,8.65 21.725,10.675 21.725,10.725 21.9,10.9 R12_IAS0.2@21.95,10.9
NetJ6_IAS0_2: J6_IAS0.2 U2_IAS0.4 | length 12.5
  Layer1 Top w0.15: v1(26,13.85) 26.27,13.58 26.27,13.305 U2_IAS0.4@26.325,13.25
  Layer4 Bottom w0.15: J6_IAS0.2@19.7,4.76 20.9,5.96 20.9,8.8 25.95,13.85 v1(26,13.85)
NetJ6_IAS1_1: J6_IAS1.1 R12_IAS1.2 | length 2.2
  Layer1 Top w0.2: R12_IAS1.2@85.25,9.2 85.9,8.55 J6_IAS1.1@85.9,7.3
NetJ6_IAS1_2: J6_IAS1.2 U2_IAS1.4 | length 15.9
  Layer1 Top w0.15: v1(80.178,13.337) 80.178,12.912 80.353,12.737 80.353,12.726 80.492,12.587 U2_IAS1.4@80.503,12.587
  Layer1 Top w0.2: v1(79.8,9.95) 79.8,9.45 80.375,8.875 82.275,8.875 83.15,8 83.15,4.302 83.402,4.05 84.9,4.05 85.61,4.76 J6_IAS1.2@85.9,4.76
  Layer2 w0.2: v1(79.8,9.95) 80.35,10.5 80.35,13.084 80.178,13.256 v1(80.178,13.337)
NetR14_IAS0_2: R14_IAS0.2 U2_IAS0.2 | length 2.6
  Layer1 Top w0.15: R14_IAS0.2@27.85,14.2 27.994,14.056 28.244,14.056 28.8,13.5 28.8,12.75 28.65,12.6 U2_IAS0.2@28.275,12.6
NetR14_IAS1_2: R14_IAS1.2 U2_IAS1.2 | length 2.6
  Layer1 Top w0.15: R14_IAS1.2@82.028,13.537 82.173,13.393 82.423,13.393 82.978,12.837 82.978,12.087 82.828,11.937 U2_IAS1.2@82.453,11.937
PWDN_IAS0: J8_IAS0.21 R73_IAS0.1 R75_IAS0.2 U4_IAS0.3 | length 49
  Layer1 Top w0.15: U4_IAS0.3@30.9,7.75 30.923,7.727 30.923,7.427 31.198,7.152 v1(31.198,7.128) ; v1(37.75,10.95) 37.7,10.95 R75_IAS0.2@36.25,12.4 R73_IAS0.1@36.25,13.6 36.85,14.2 39.05,14.2 40.3,15.45 v1(41,15.45)
  Layer4 Bottom w0.15: v1(31.198,7.128) 31.264,7.195 31.264,7.614 32.591,8.941 33.1,9.45 36.65,9.45 37.75,10.55 v1(37.75,10.95) ; v1(41,15.45) 41,19.1 41.9,20 41.9,42.05 42.85,43 44.65,43 44.94,42.71 44.94,42.44 J8_IAS0.21@44.98,42.4
PWDN_IAS1: J8_IAS1.21 R73_IAS1.1 R75_IAS1.2 U4_IAS1.3 | length 50
  Layer1 Top w0.15: R73_IAS1.1@107.3,13.45 v1(108,12.75) ; U4_IAS1.3@112.05,7.7 112.041,7.709 112.041,8.391 v1(112.05,8.4)
  Layer1 Top w0.2: R73_IAS1.1@107.3,13.45 R75_IAS1.2@107.3,14.55 ; R75_IAS1.2@107.3,14.65 v1(107.3,22.8)
  Layer4 Bottom w0.15: J8_IAS1.21@95.02,42.4 95.02,42.8 95.891,43.671 102.679,43.671 103.4,42.95 103.4,25.05 105.65,22.8 v1(107.3,22.8) ; v1(108,12.75) 110.05,10.7 111.45,10.7 112.05,10.1 v1(112.05,8.4)